# Altium PCB PCB1.PcbDoc
Units mm, origin at the board's own origin, x right, y up, seen from the top; angles counter-clockwise.
Board outline 157.3 x 81.25 mm, 2 copper layers (Top Layer, Bottom Layer); 23 components, 10 nets, 54 pads, 0 vias.
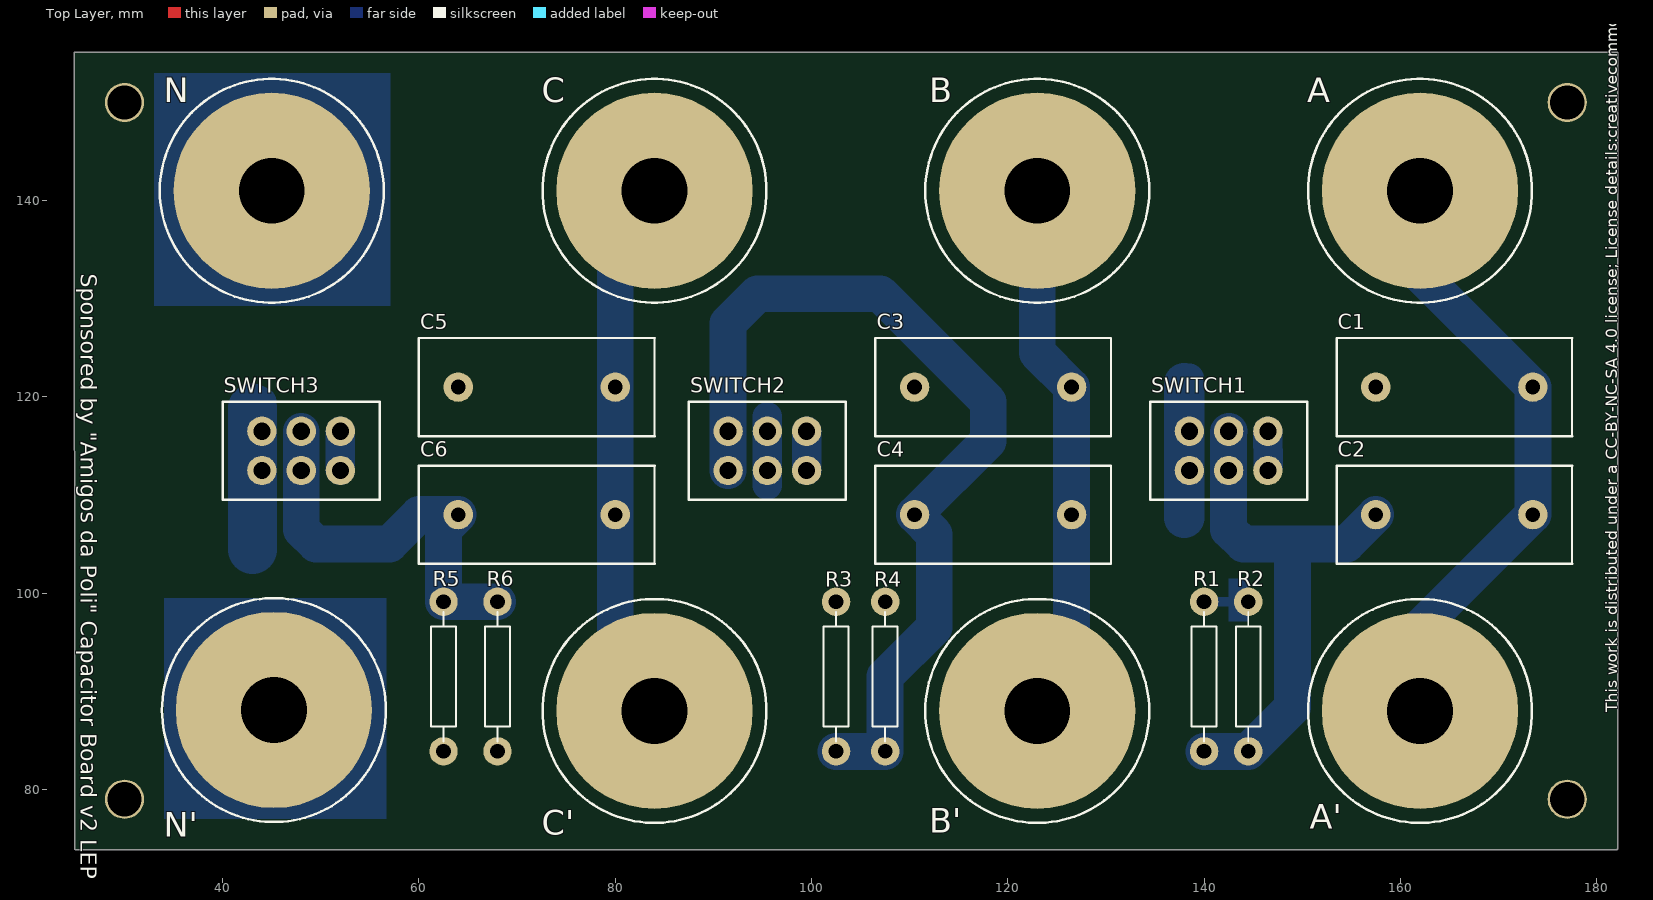
[diagram p0: Top Layer view]
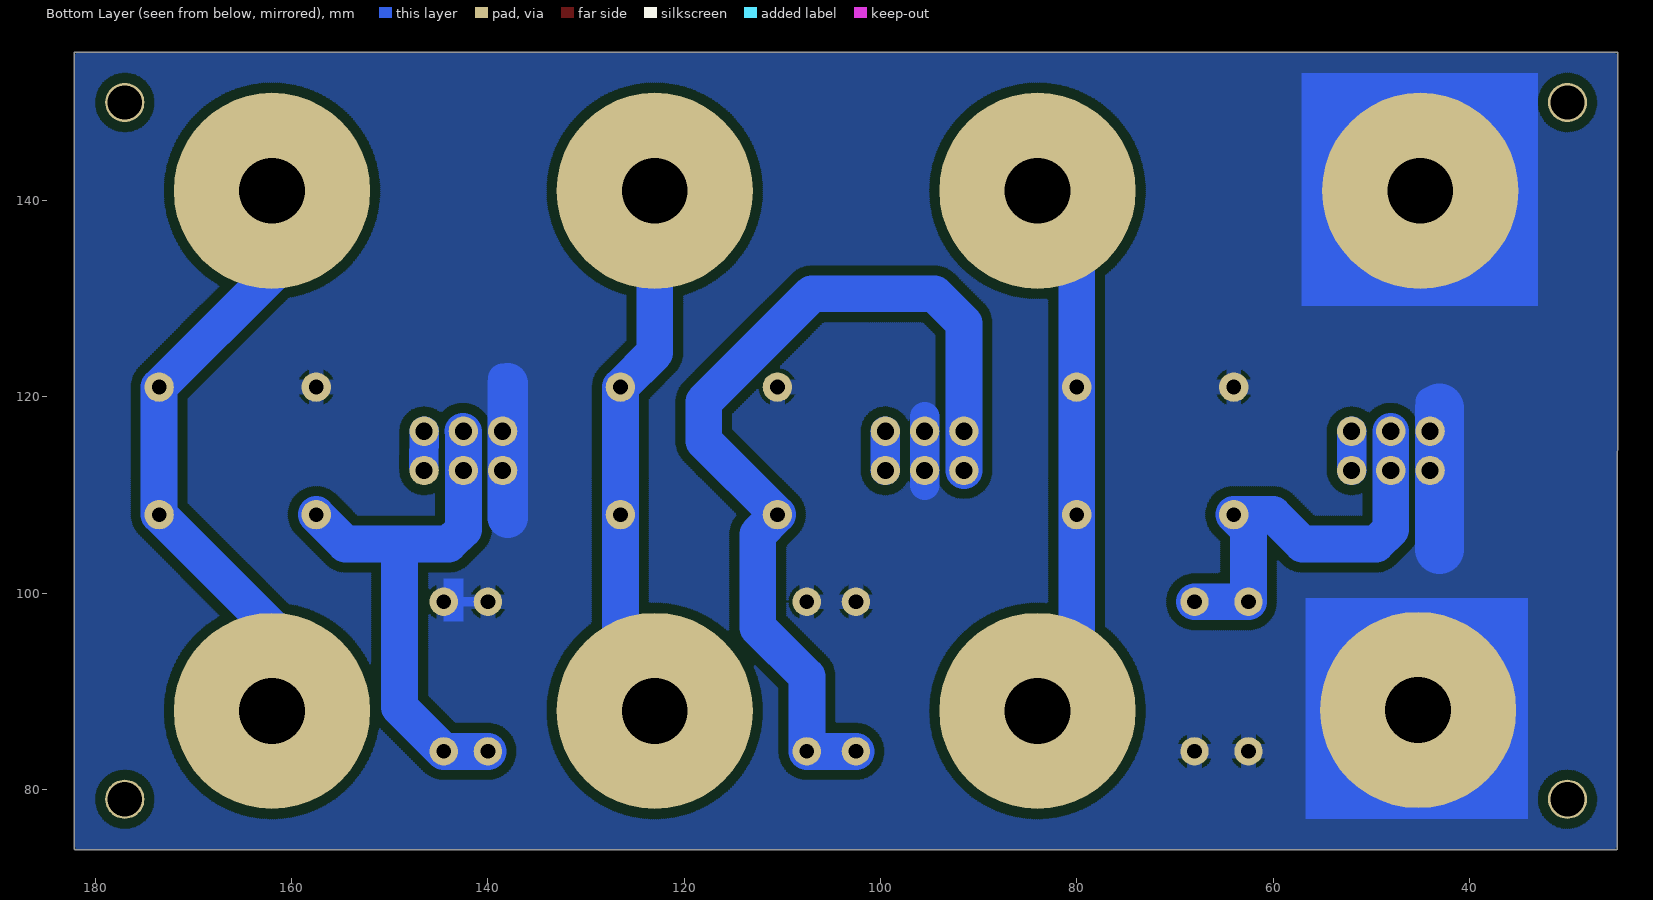
[diagram p1: Bottom Layer view, seen from below]

## Layer stack, top to bottom
Top Solder: solder mask 0.0102, Solder Resist, Dk 3.5
Top Layer: signal copper 0.0356
Dielectric 1: dielectric 0.32, FR-4, Dk 4.8
Bottom Layer: signal copper 0.0356
Bottom Solder: solder mask 0.0102, Solder Resist, Dk 3.5

## Board outline
24.904,74 24.863,155 cw(c24.99,155) 25.011,155.125 cw(c25.033,155) 25.033,155.127 182.033,155.127 cw(c182.033,155) 182.16,155 182.16,74 cw(c182.033,74) 182.011,73.875 25.053,73.875 cw(c25.031,74)

## Design rules (kind name [scope] priority, off if disabled: settings)
Clearance Clearance_1 [(InPolygon)] p1: gap=1
Clearance [All] p2: gap=0.2
PlaneConnect [All] p1: planeconnectstyle=Relief reliefexpansion=0.508 reliefentries=4 reliefconductorwidth=1.5 reliefairgap=0.254
PolygonConnect [All] p1: connectstyle=Relief reliefconductorwidth=1.5 reliefentries=4 polygonreliefangle="90 Angle" airgapwidth=0.4
RoomDefinition Sheet1 [InComponentClass('Sheet1')] p1: confinementstyle=ConfineIn formatcopy=TRUE lockcomponents=FALSE outline 182.5,154.5 25,154.5 25,74 182.5,74
RoutingVias [All] p1: holewidth=0.711 width=1.27 viastyle="Through Hole" minholewidth=0.711 minwidth=1.27 maxholewidth=0.711 maxwidth=1.27
SolderMaskExpansion [All] p1: expansion=0.102
Width [All] p1: maxlimit=6 minlimit=0.2 preferedwidth=3
29 further rules are at their usual default settings.

## Components (designator, comment, footprint, x,y, rotation, side; value= is the part's Value field where it differs from the comment)
A "Socket" PCBComponent_1#1 153.11,132.618 r0 top
A' "Socket" PCBComponent_1#1 170.382,79.11 r90 top
B "Socket" PCBComponent_1#1 114.11,132.618 r0 top
B' "Socket" PCBComponent_1#1 131.382,79.11 r90 top
C "Socket" PCBComponent_1#1 75.11,132.618 r0 top
C1 "Film" PCBComponent_1#2 183.5,126 r180 top
C2 "Film" PCBComponent_1#2 183.5,113 r180 top
C3 "Film" PCBComponent_1#2 136.5,126 r180 top
C4 "Film" PCBComponent_1#2 136.5,113 r180 top
C5 "Film" PCBComponent_1#2 90,126 r180 top
C6 "Film" PCBComponent_1#2 90,113 r180 top
C' "Socket" PCBComponent_1#1 92.382,79.11 r90 top
N "Socket" PCBComponent_1#1 53.382,132.11 r90 top
N' "Socket" PCBComponent_1#1 53.6,79.2 r90 top
R1 "2W" AXIAL-0.6 140,91.5 r90 top
R2 "2W" AXIAL-0.6 144.5,91.5 r90 top
R3 "2W" AXIAL-0.6 102.5,91.5 r90 top
R4 "2W" AXIAL-0.6 107.5,91.5 r90 top
R5 "2W" AXIAL-0.6 62.5,91.5 r270 top
R6 "2W" AXIAL-0.6 68,91.5 r270 top
SWITCH1 "CHAVE" PCBComponent_1#3 130.75,107.5 r0 top
SWITCH2 "CHAVE" PCBComponent_1#3 83.75,107.5 r0 top
SWITCH3 "CHAVE" PCBComponent_1#3 36.25,107.5 r0 top

## Footprints (in the part's own frame and the unit in brackets; to place one, negate y for a bottom-side part, rotate by r counter-clockwise, add the part's x,y. Pads: shape width x height; smd on the part's side, far side on the other; paste and mask are expansions set on the pad)
AXIAL-0.6 [mm] "Axial Device, Thru-Hole; 2 Leads; 0.6 in Pin Spacing"
  round 2.9 hole 1.5: 1(-7.62,0) 2(7.62,0)
  silkscreen extent -6.6,-1.27 6.6,1.27
PCBComponent_1#1 [mm] "Connector; Plug"
  round 20 hole 6.7: 1(8.89,8.382)
  silkscreen extent -2.52,-3.02 20.3,19.79
PCBComponent_1#2 [mm]
  round 3 hole 1.5: 1(10,5) 2(26,5)
  silkscreen extent 6,0 30,10
PCBComponent_1#3 [mm]
  round 3 hole 1.75: 1(7.75,9) 2(7.75,5) 3(11.75,9) 4(11.75,5) 5(15.75,9) 6(15.75,5)
  silkscreen extent 3.75,2 19.75,12

## Part data
C1 C2 C3 C4 C5 C6: library part Cap, "Capacitor"
R1 R2 R3 R4 R5 R6: library part Res1, "Resistor"

## Free pads (board coordinates)
  round 4 hole 3.5: 10(30,150) 11(177,150) 12(177,79) 13(30,79)

## Nets (pads, with @x,y where several pads share a name; then routed paths per layer and width w, separated by ;. In a path a pad name is that pad's centre, name@x,y a point inside that pad or via, vN(x,y) a via of type N, cw(c..) or ccw(c..) an arc to the next point about the centre after c; other vN are vias at no path point)
GND: C1.2 C3.2 C5.2 N'.1 N.1 R1.2 R2.2 R3.2 R4.2 R5.2 R6.2 SWITCH1.1 SWITCH1.2 SWITCH2.3 SWITCH2.4 SWITCH3.1 SWITCH3.2 | length 40.9
  Bottom Layer w1: R1.2 R2.2@144.371,99.12
  Bottom Layer w3: 42.469,118.841 42.5,118.872 ; 44,118.872 44,119.5 ; 95.5,111 SWITCH2.3@95.5,118 ; 137.973,121.393 138.5,121.92
  Bottom Layer w4.1: 137.973,107.696 137.973,121.393
  Bottom Layer w5: 43.047,104.445 43.047,118.846
NetB'_1: B'.1 B.1 C3.1 C4.1 | length 58
  Bottom Layer w3.75: B'.1@121.5,89.5 B'.1 126.5,91.5 C4.1 C3.1 123,124.5 B.1
NetC2_2: C2.2 R1.1 R2.1 SWITCH1.3 SWITCH1.4 | length 54.4
  Bottom Layer w3.75: R1.1 R2.1 149,88.38 149,105 ; SWITCH1.3@142.551,116.5 142.5,116.449 142.5,106.5 144,105 154.5,105 C2.2
NetC4_2: C4.2 R3.1 R4.1 SWITCH2.1 SWITCH2.2 | length 93.9
  Bottom Layer w3.75: SWITCH2.2 91.5,127.5 94.5,130.5 107,130.5 118,119.5 118,115.5 C4.2 112.5,106 112.5,96.5 107.5,91.5 R4.1 R3.1
NetC5_1: C5.1 C6.1 C'.1 C.1 | length 62.8
  Bottom Layer w3.75: C'.1 80,92 C6.1 C5.1 80,137 C.1 C.1@84,134.5
NetC6_2: C6.2 R5.1 R6.1 SWITCH3.3 SWITCH3.4 | length 42.9
  Bottom Layer w3.75: SWITCH3.3 48,111 48,106.5 49.5,105 57,105 60,108 C6.2 62.5,106.5 R5.1 R6.1
NetSWITCH1_5: SWITCH1.5 SWITCH1.6 | length 3.5
  Bottom Layer w3: SWITCH1.5 SWITCH1.6@146.548,113.001
NetSWITCH2_5: SWITCH2.5 SWITCH2.6 | length 4
  Bottom Layer w3: SWITCH2.6 SWITCH2.5
NetSWITCH3_5: SWITCH3.5 SWITCH3.6 | length 4
  Bottom Layer w3: SWITCH3.6 SWITCH3.5
VCC: A'.1 A.1 C1.1 C2.1 | length 62.5
  Bottom Layer w3.75: A'.1 162,96.5 C2.1 C1.1 162,132.5 A.1

## Polygon pours and split planes (outlines as drawn)
GND on Bottom Layer "Bottom Layer-No Net" (hatched 90Degree grid 0 track 0.203, pour order 24): 25,74 25,155 182,155 182,74

## Other copper
Bottom Layer:
  rectangle net GND: 142.5,97.13 144.5,101.5
  rectangle net GND: 33,129.235 57.099,153
  rectangle net GND: 34,77.013 56.693,99.5

## Silkscreen, mask and mechanical layers (free items; w line width, h text height)
Top Overlay:
  text "Sponsored by \"Amigos da Poli\" Capacitor Board v2 LEP-PEA-EPUSP, 2020" at 25,132.552 h2.8 r270
  text "This work is distributed under a CC-BY-NC-SA 4.0 license; License details:creativecommons.org/licenses/by-nc-sa/4.0" at 182.5,87.874 h2 r90
Mechanical 1:
  lines w0.254: 24.99,155 25.031,74 182.033,74 182.033,155 25.033,155